# Altium PCB Main_PCB_v1.0.PcbDoc
Units mil, origin at the board's own origin, x right, y up, seen from the top; angles counter-clockwise.
Board outline 532.28 x 531.5 mil, 2 copper layers (Top Layer, Bottom Layer), stack 57 mil thick; 10 components, 6 nets, 31 pads, 4 vias.
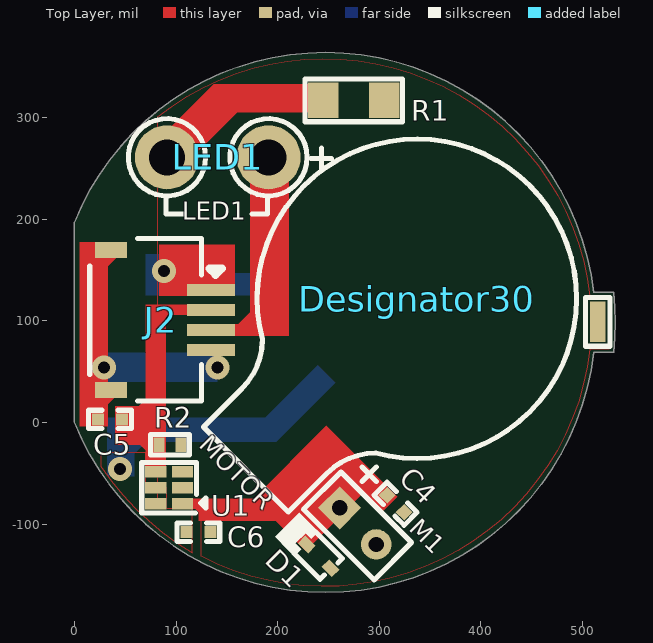
[diagram p0: Top Layer view]
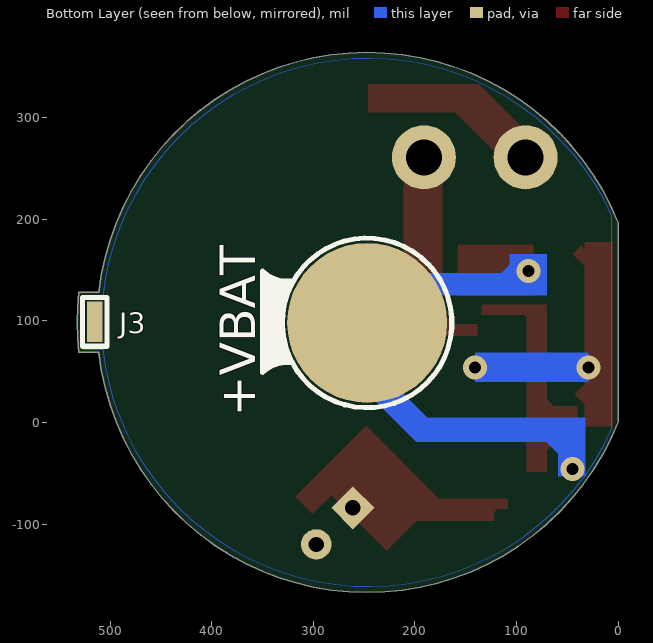
[diagram p1: Bottom Layer view, seen from below]
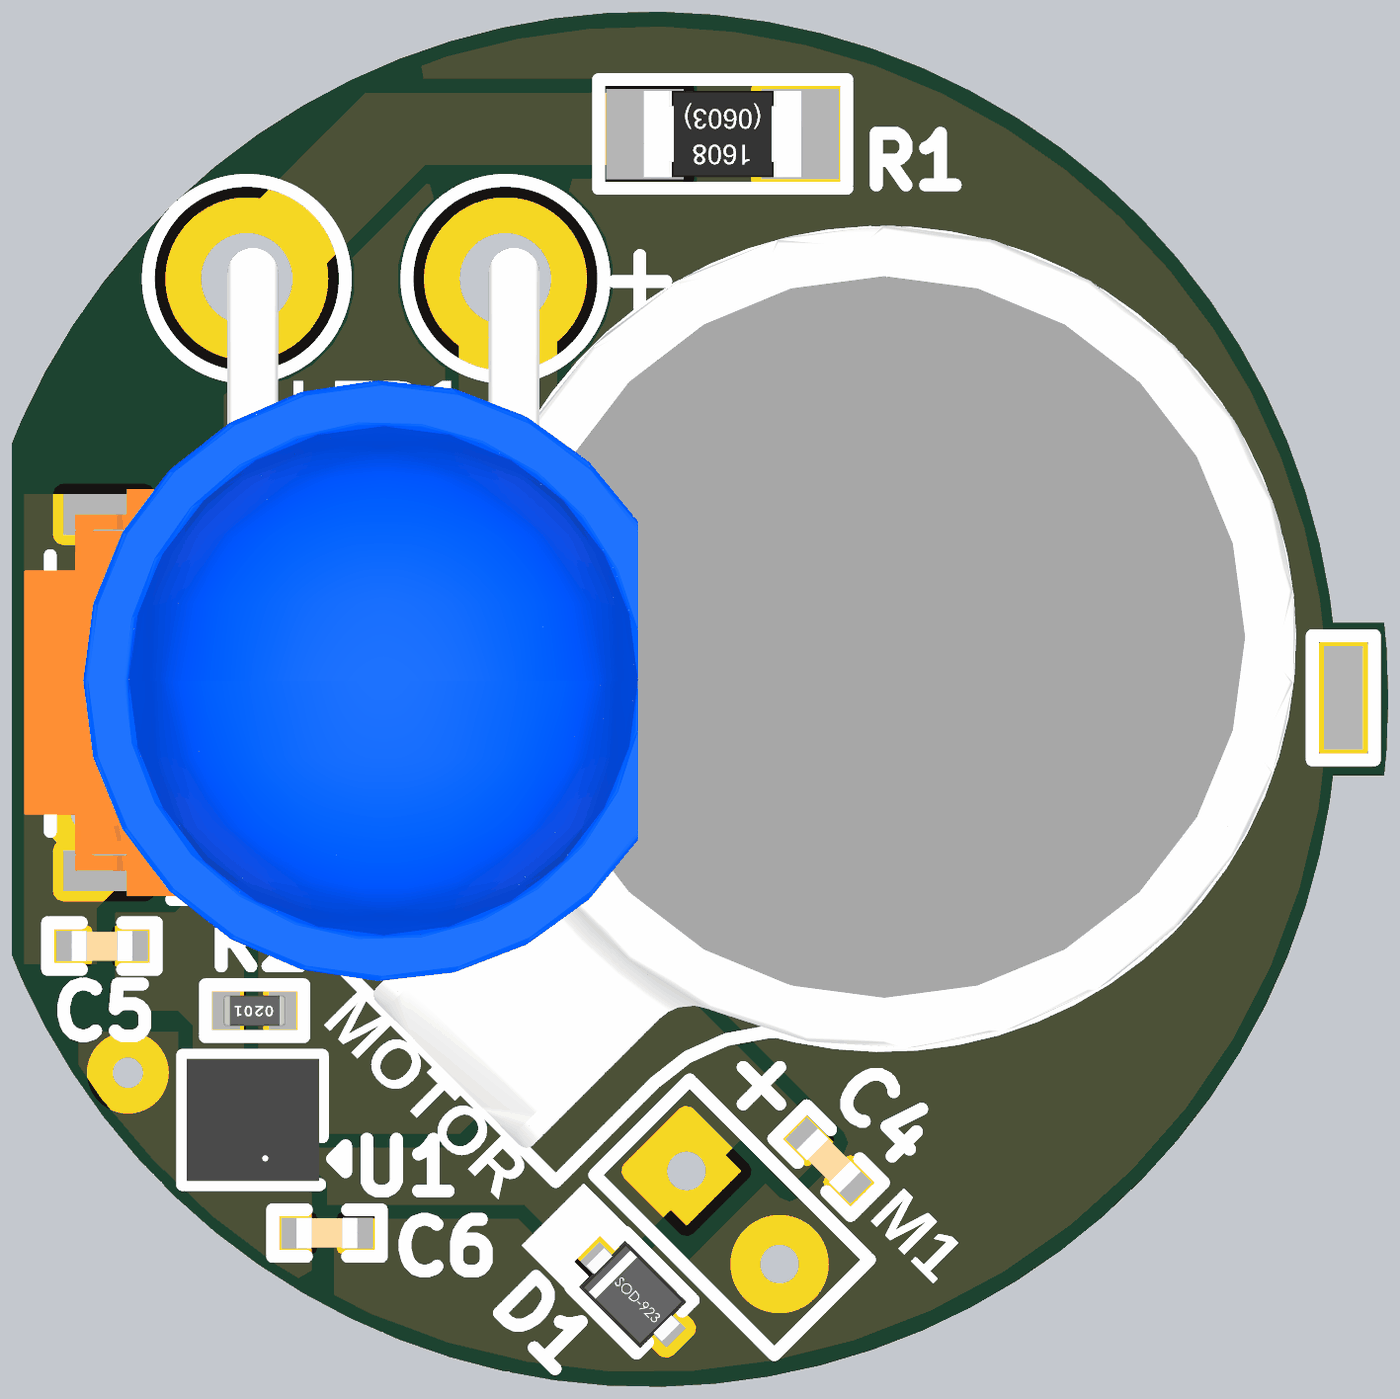
[diagram p2: 3D render of the assembled board from above, using the file's embedded part models]

## Layer stack, top to bottom
Top Solder: solder mask 3, Solder Resist, Dk 3.5
Top Layer: signal copper 10
Dielectric 1: dielectric 37, FR-4, Dk 4.8
Bottom Layer: signal copper 10
Bottom Solder: solder mask 3, Solder Resist, Dk 3.5

## Board outline
0,0 ccw(c246.85,98.43) 510.95,68.9 530.75,68.9 ccw(c246.85,98.43) 530.75,127.95 510.95,127.95 ccw(c246.85,98.43) 0,196.85

## Design rules (kind name [scope] priority, off if disabled: settings)
Clearance Clearance_1 [OnLayer('Bottom Layer')] p1: gap=10 ignorepadtopadclearanceinfootprint=FALSE except(0: Arc-Hole Track-Hole SMDPad-Hole THPad-Hole Via-Hole Fill-Hole Poly-Hole Region-Hole Text-Hole; 20: Arc-Fill Arc-Poly Arc-Region Track-Fill Track-Poly Track-Region SMDPad-Fill SMDPad-Poly SMDPad-Region Via-Fill Via-Poly Via-Region Fill-Fill Fill-Poly Fill-Region Poly-Poly Poly-Region Region-Region)
Clearance [OnLayer('Top Layer')] p2: gap=10 ignorepadtopadclearanceinfootprint=FALSE except(0: Arc-Hole Track-Hole SMDPad-Hole THPad-Hole Via-Hole Fill-Hole Poly-Hole Region-Hole Text-Hole; 3: SMDPad-SMDPad; 5: Arc-SMDPad Track-SMDPad SMDPad-Fill SMDPad-Poly SMDPad-Region Fill-Fill Fill-Poly Fill-Region Poly-Poly Poly-Region Region-Region)
MinimumSolderMaskSliver [All] p1: minsoldermaskwidth=0
PolygonConnect [All] p1: connectstyle=Direct reliefconductorwidth=10 reliefentries=4 polygonreliefangle="90 Angle" airgapwidth=10
RoutingVias [All] p1: holewidth=11.81 width=23.62 viastyle="Through Hole" minholewidth=11.81 minwidth=23.62 maxholewidth=11.81 maxwidth=23.62
SilkToSilkClearance [All] p1: silktosilkclearance=0
SilkToSolderMaskClearance [IsPad] p1: minsilkscreentomaskgap=0 clearancetoexposedcopper=TRUE
SolderMaskExpansion [All] p1: expansion=4 istentingtop=FALSE
Width [All] p1: maxlimit=10 minlimit=10 preferedwidth=10
27 further rules are at their usual default settings.

## Classes and differential pairs
component class Main_PCB: C4 C5 C6 J2 LED1 R1 R2 U1

## Components (designator, comment, footprint, x,y, rotation, side; value= is the part's Value field where it differs from the comment)
C4 "100nF" CAP-0201 316,-80 r135 top
C5 "100nF" CAP-0201 35,3 r0 top
C6 "100nF" CAP-0201 122,-108 r180 top
D1 "1SS427" SOD-923. 240.31,-131.8 r315 top
Designator30 "Comment" "Motor 8mm" 337,122 r315 top locked
J2 "FH19C-4S-0.5SH(10)" FH19C-4S-0.5SH(10) 85,101 r270 top locked
LED1 "333-2UTC/S400-A6" "LED BEND" 141,261 r180 top locked
R1 "1K" Res-0603 275,317 r0 top
R2 "10K" Res-0201 94,-22 r180 top
U1 "LDK120PU33R" "6-DFN (1.2x1.3)" 93.19,-64.25 r180 top locked

## Footprints (in the part's own frame and the unit in brackets; to place one, negate y for a bottom-side part, rotate by r counter-clockwise, add the part's x,y. Pads: shape width x height; smd on the part's side, far side on the other; paste and mask are expansions set on the pad)
"6-DFN (1.2x1.3)" [mm]
  rect 0.53x0.28 smd mask+0.055: 1(-0.335,0.4) 2(-0.335,0) 3(-0.335,-0.4) 4(0.335,-0.4) 5(0.335,0) 6(0.335,0.4)
  silkscreen extent -0.91,-0.64 0.69,0.64, body extent -0.65,-0.6 0.65,0.6, height 0.55
CAP-0201 [mm]
  rect 0.3x0.3 smd mask+0.055: 1(-0.3,0) 2(0.3,0)
  silkscreen extent -0.53,-0.23 0.53,0.23, body extent -0.3,-0.15 0.3,0.15, height 0.28
FH19C-4S-0.5SH(10) [mm]
  rect 0.3x1.2 smd: 1(-0.75,1.25) 2(-0.25,1.25) 3(0.25,1.25) 4(0.75,1.25)
  rect 0.4x0.8 smd: MP1(-1.75,-1.25) MP2(1.75,-1.25)
  silkscreen extent -2.03,-1.78 2.03,1.52, body extent -2,-2.03 2,1.47, height 0.9
"LED BEND" [mm]
  round 1.6 hole 0.9: 1(1.27,0) 2(-1.27,0)
  silkscreen extent -2.84,-0.23 -2.34,0.28, body extent -2.57,-0.3 2.88,6.9, height 17.1
"Motor 8mm" [mil]
  silkscreen extent -157,-238 157,157, body extent -159,-238 159,160, height 118
Res-0201 [mm]
  rect 0.27x0.37 smd mask+0.055: 1(-0.275,0) 2(0.275,0)
  silkscreen extent -0.48,-0.25 0.48,0.25, body extent -0.3,-0.15 0.3,0.15, height 0.29
Res-0603 [mil]
  rect 30x35 smd: 1(-30,0) 2(30,0)
  silkscreen extent -48,-21 48,21, body extent -31,-17 31,17, height 18
SOD-923. [mm]
  rect 0.36x0.27 smd: 1(-0.42,0) 2(0.42,0)
  silkscreen extent -1.12,-0.43 0.46,0.43, body extent -0.52,-0.32 0.53,0.32, height 0.43

## Part data
C4 C5 C6: library part CC0201KRX5R6BB104, "CAP CER 0.1UF 10V X5R 0201", Case Code (Imperial)=0201, Case Code (Metric)=0603, Dielectric=X5R, LCSC Part Number=C190183, Manufacturer=Yageo, Max Operating Temperature=85°C, Min Operating Temperature=-55°C, Resistor Type=Ceramic, Supplier Part Number 1=603-CC201KRX5R6BB104, Tolerance=10%, Voltage Rating=10V, Capacitance=100nF, Case/Package=0201, Category="Ceramic Capacitors", ComponentLink1Description=https://datasheet.ciiva.com/11587/upy-gphc-x5r-4v-to-50v-12-11587190.pdf?src-supplier=Avnet, ComponentLink1URL=https://datasheet.ciiva.com/11587/upy-gphc-x5r-4v-to-50v-12-11587190.pdf?src-supplier=Avnet, Construction=Flat, Depth=0.3mm, Halogen Free="Halogen Free", Height=0.3mm, Lead Free="Lead Free", Length=0.6mm, Manufacturer Part Number=CC0201KRX5R6BB104, Mount="Surface Mount", Packaging="Tape and Reel", Pricing 1="1=0.10000, 10=0.02400, 50=0.02400, 100=0.01900, 1000=0.01100, 10000=0.00900 (USD)", Radiation Hardening=No, RoHS=Yes, RoHS Compliant=Yes, Series=CC, Stock 1=824403, Supplier 1=Mouser, Termination=SMD/SMT, Thickness=0.013inch, Voltage Rating (DC)=10V, Weight=6E-06oz, Width=0.012inch
D1: library part 1SS427,L3M, "DIODE GEN PURP 80V 100MA SOD923", Average Rectified Current=3A, Case/Package=SMC, Forward Voltage=750mV, LCSC Part Number=C16015, Manufacturer="ON Semiconductor / Fairchild", Manufacturer Part Number=SS36, Max Forward Surge Current (Ifsm)=100A, Max Operating Temperature=150°C, Max Repetitive Reverse Voltage (Vrrm)=60V, Max Reverse Current=500uA, Min Operating Temperature=-55°C, Package Quantity=3000, Power Dissipation=2.27W, Supplier Part Number 1=9034425P, Category="Schottky Diodes", ComponentLink1Description=https://datasheet.ciiva.com/4714/ss36-197193-4714610.pdf?src-supplier=Mouser, ComponentLink1URL=https://datasheet.ciiva.com/4714/ss36-197193-4714610.pdf?src-supplier=Mouser, ComponentLink2Description=https://datasheet.ciiva.com/16889/ss36-16889545.pdf?src-supplier=Future+Electronics, ComponentLink2URL=https://datasheet.ciiva.com/16889/ss36-16889545.pdf?src-supplier=Future+Electronics, ComponentLink3Description=https://datasheet.ciiva.com/920/ss34-920433.pdf?src-supplier=Digi-Key, ComponentLink3URL=https://datasheet.ciiva.com/920/ss34-920433.pdf?src-supplier=Digi-Key, ComponentLink4Description=https://datasheet.ciiva.com/920/ss34-920434.pdf?src-supplier=Digi-Key, ComponentLink4URL=https://datasheet.ciiva.com/920/ss34-920434.pdf?src-supplier=Digi-Key, ComponentLink5Description=https://datasheet.ciiva.com/920/ss34-920435.pdf?src-supplier=Digi-Key, ComponentLink5URL=https://datasheet.ciiva.com/920/ss34-920435.pdf?src-supplier=Digi-Key, Current=3A, Current Rating=3A, Element Configuration=Single, Forward Current=3A, Item Type=Diode, Lead Free="Lead Free", Max Reverse Leakage Current=500uA, Max Reverse Voltage (DC)=60V, Max Surge Current=100A, Mount="Surface Mount", Number of Pins=2, Output Current=3A, Packaging="Tape and Reel", Peak Non-Repetitive Surge Current=100A, Polarity=Standard, Pricing 1="100=0.43800, 500=0.34200, 1000=0.27800, 3000=0.25000 (GBP)", Radiation Hardening=No, Reach SVHC Compliant=Yes, RoHS=Yes, RoHS Compliant=Yes, Series=-, Stock 1=100, Supplier 1=Rs, Voltage=60V, Voltage Rating (DC)=60V
J2: "CONN FFC BOTTOM 4POS 0.5MM R/A", Current Rating=500mA, Flammability Rating="UL94 V-0", Insulation Resistance=500MR, LCSC Part Number=C424650, Manufacturer=Hirose, Max Operating Temperature=85°C, Min Operating Temperature=-55°C, Package Quantity=5000, Supplier Part Number 1=H125822CT-ND, Voltage Rating=50V, Actuator Material="Polymer,Polyphenylene,Liquid Crystal Polymer", Category="FFC / FPC", ComponentLink1Description=https://datasheet.ciiva.com/18563/ed-fh19cfh19sc-20140305-18563548.pdf?src-supplier=Digi-Key, ComponentLink1URL=https://datasheet.ciiva.com/18563/ed-fh19cfh19sc-20140305-18563548.pdf?src-supplier=Digi-Key, Contact Material=Bronze, Contact Plating=Gold, Housing Material=Polymer, Item Type="FPC Connector", Manufacturer Part Number=FH19C-4S-0.5SH(10), Mounting Technology="Surface Mount", Number of Positions=4, Packaging="Tape and Reel", Pitch=0.02inch, Pricing 1="1=1.08, 10=0.916, 25=0.878, 50=0.8596, 100=0.8221, 250=0.7474, 500=0.67266, 1000=0.59792, 2500=0.54186 (USD)", RoHS=Yes, RoHS Compliant=Yes, Series=FH19C, Stock 1=7956, Supplier 1=Digi-Key, Termination=Solder, Wire/Cable Type="Flat Flex"
LED1: "Colorless transparence -40℃~+85℃ White light 15° 100mW Plugin,D=5mm Light Emitting Diodes (LED) ROHS", JLCPCB Part Class="Extended Part", LCSC Part Number=C99695, Manufacturer="Everlight Elec", Package=Plugin,D=5mm, Item Type=LED, Manufacturer Part Number=333-2UTC/S400-A6
R1: library part RC0603FR-071KL, "RES SMD 1K OHM 1% 1/10W 0603", Case Code (Imperial)=0603, Case Code (Metric)=1608, LCSC Part Number=C22548, Manufacturer=Yageo, Max Operating Temperature=155°C, Min Operating Temperature=-55°C, Power Rating=100mW, Resistance=1kR, Supplier Part Number 1=311-1.00KHRDKR-ND, Temperature Coefficient=100ppm/°C, Tolerance=1%, Voltage Rating=50V, Case/Package=0603, ComponentLink1Description=https://www.verical.com/server-webapp/html/getDatasheet?partID=409289&src-supplier=Verical, ComponentLink1URL=https://www.verical.com/server-webapp/html/getDatasheet?partID=409289&src-supplier=Verical, ComponentLink2Description=http://documents.rs-components.com/techlib://itc_doclist_GB.htm?stockno=5048928&src-supplier=RSComponents, ComponentLink2URL=http://documents.rs-components.com/techlib://itc_doclist_GB.htm?stockno=5048928&src-supplier=RSComponents, ComponentLink3Description=http://www.yageo.com/documents/recent/PYu-RC0603_51_RoHS_L_4.pdf?src-supplier=Avnet+Europe, ComponentLink3URL=http://www.yageo.com/documents/recent/PYu-RC0603_51_RoHS_L_4.pdf?src-supplier=Avnet+Europe, ComponentLink4Description=http://www.farnell.com/datasheets/2167052.pdf?src-supplier=Element14, ComponentLink4URL=http://www.farnell.com/datasheets/2167052.pdf?src-supplier=Element14, ComponentLink5Description=http://www.farnell.com/datasheets/1868787.pdf?src-supplier=Element14, ComponentLink5URL=http://www.farnell.com/datasheets/1868787.pdf?src-supplier=Element14, ComponentLink6Description=http://www.yageo.com/documents/recent/PYu-RC_Group_51_RoHS_L_2.pdf?src-supplier=Avnet, ComponentLink6URL=http://www.yageo.com/documents/recent/PYu-RC_Group_51_RoHS_L_2.pdf?src-supplier=Avnet, ComponentLink7Description=https://www.verical.com/server-webapp/html/getDatasheet?partID=404327&src-supplier=Verical, ComponentLink7URL=https://www.verical.com/server-webapp/html/getDatasheet?partID=404327&src-supplier=Verical, ComponentLink8Description=http://www.farnell.com/datasheets/443971.pdf?src-supplier=Element14, ComponentLink8URL=http://www.farnell.com/datasheets/443971.pdf?src-supplier=Element14, Composition="Thick Film", Contact Plating=Tin,Matte, Depth=0.8mm, Height=0.45mm, Item Type=Resistor, Lead Free="Lead Free", Length=1.6mm, Manufacturer Part Number=RC0603FR-071KL, Military Standard=Not, Packaging="Tape and Reel", Pricing 1="1=0.1, 10=0.023, 100=0.0094, 1000=0.0042, 2500=0.0037 (USD)", Radiation Hardening=No, REACH SVHC="No SVHC", Stock 1=21472395, Supplier 1=Digi-Key, Termination=SMD/SMT
R2: library part RC0201JR-0710KL, "RES SMD 10K OHM 5% 1/20W 0201", Case Code (Imperial)=0201, Case Code (Metric)=0603, LCSC Part Number=C138117, Manufacturer=Yageo, Max Operating Temperature=125°C, Min Operating Temperature=-55°C, Power Rating=50mW, Resistance=10kR, Resistor Type="Thick Film", Supplier Part Number 1=311-10KNCT-ND, Temperature Coefficient=200ppm/°C, Tolerance=5%, Voltage Rating=25V, Case/Package=0201, Category="Chip SMD Resistors", ComponentLink1Description="New link", ComponentLink2Description=https://datasheet.ciiva.com/8891/pyu-rc0201-51-rohs-l-8-8891388.pdf?src-supplier=Avnet, ComponentLink2URL=https://datasheet.ciiva.com/8891/pyu-rc0201-51-rohs-l-8-8891388.pdf?src-supplier=Avnet, ComponentLink3Description=https://datasheet.ciiva.com/7672/1563626-7672253.pdf?src-supplier=Element14, ComponentLink3URL=https://datasheet.ciiva.com/7672/1563626-7672253.pdf?src-supplier=Element14, ComponentLink4Description=https://datasheet.ciiva.com/28405/pyu-rc0201-51-rohs-l-8-28405613.pdf?src-supplier=Avnet+Europe, ComponentLink4URL=https://datasheet.ciiva.com/28405/pyu-rc0201-51-rohs-l-8-28405613.pdf?src-supplier=Avnet+Europe, ComponentLink5Description=https://datasheet.ciiva.com/7672/1563626-7672254.pdf?src-supplier=Element14, ComponentLink5URL=https://datasheet.ciiva.com/7672/1563626-7672254.pdf?src-supplier=Element14, ComponentLink6Description=https://datasheet.ciiva.com/7660/1421516-7660810.pdf?src-supplier=Element14, ComponentLink6URL=https://datasheet.ciiva.com/7660/1421516-7660810.pdf?src-supplier=Element14, ComponentLink7Description=https://datasheet.ciiva.com/16856/pyu-rc0201-51-rohs-l-8-16856011.pdf?src-supplier=Avnet+Europe, ComponentLink7URL=https://datasheet.ciiva.com/16856/pyu-rc0201-51-rohs-l-8-16856011.pdf?src-supplier=Avnet+Europe, ComponentLink8Description=https://datasheet.ciiva.com/46391/1421516-46391291.pdf?src-supplier=Element14, ComponentLink8URL=https://datasheet.ciiva.com/46391/1421516-46391291.pdf?src-supplier=Element14, Contact Plating=Tin,Matte, Depth=0.3mm, Lead Free="Lead Free", Length=0.6mm, Manufacturer Part Number=RC0201JR-0710KL, Military Standard=Not, Packaging="Tape and Reel", Pricing 1="1=0.10000, 10=0.02600, 100=0.01050, 1000=0.00472, 2500=0.00410, 5000=0.00338 (USD)", Radiation Hardening=No, REACH SVHC=Unknown, RoHS=Yes, Stock 1=1488597, Supplier 1=Digi-Key, Termination=SMD/SMT, Voltage Rating (DC)=25V
U1: "IC REG LINEAR 3.3V 200MA 6DFN", Case/Package=DFN, Dropout Voltage=150mV, LCSC Part Number=C2971162, Manufacturer=STMicroelectronics, Max Operating Temperature=125°C, Max Output Current=200mA, Max Supply Voltage=5.5V, Min Input Voltage=1.9V, Min Operating Temperature=-40°C, Nominal Output Voltage=3.3V, Operating Supply Current=50uA, Package Quantity=6000, Power Supply Rejection Ratio (PSRR)=55dB, Quiescent Current=60uA, Supplier Part Number 1=511-LDK120PU33R, Accuracy=2%, Category="Voltage Regulators - Linear", ComponentLink1Description=https://datasheet.ciiva.com/48475/dm00070790-48475005.pdf?src-supplier=Avnet, ComponentLink1URL=https://datasheet.ciiva.com/48475/dm00070790-48475005.pdf?src-supplier=Avnet, Height=0.45mm, Item Type=IC, Lead Free="Lead Free", Length=1.3mm, Manufacturer Part Number=LDK120PU33R, Mounting Technology="Surface Mount", Number of Outputs=1, Number of Regulators=1, Output Current=200mA, Output Type=Fixed, Output Voltage=3.3V, Packaging="Tape and Reel", Pins=6, Polarity=Positive, Pricing 1="1=0.91, 10=0.752, 50=0.752, 100=0.614, 1000=0.388, 10000=0.343 (USD)", Radiation Hardening=No, Reach SVHC Compliant=No, RoHS=Yes, RoHS Compliant=Yes, Series=-, Stock 1=1169, Supplier 1=Mouser, Width=1.2mm

## Free pads (board coordinates)
  rect 15x40 smd far side mask+2.17: 3(515,99)
  rect 30x30 hole 15 rot 135: 4(261,-84)
  round 30 hole 15: 4(297,-120)
  round 157.48 smd far side: 7(247,98)
  rect 15x40 smd mask+2.17: 8(515,99)

## Via types
v1: diameter 23.62, hole 11.81, Top Layer to Bottom Layer, 4 vias

## Nets (pads, with @x,y where several pads share a name; then routed paths per layer and width w, separated by ;. In a path a pad name is that pad's centre, name@x,y a point inside that pad or via, vN(x,y) a via of type N, cw(c..) or ccw(c..) an arc to the next point about the centre after c; other vN are vias at no path point)
GND: C4.1 C5.1 C6.1 D1.2 J2.4 J2.MP1 J2.MP2 pad.3 pad.4@297,-120 pad.8 R1.2 R2.1 U1.2
  other v1: 28.85,54 141,54
LED: J2.3 LED1.2
MOTOR: C5.2 J2.2 R2.2 U1.4
NetLED1_1: LED1.1 R1.1
OUT: C4.2 D1.1 pad.4@261,-84 U1.1
VBAT: C6.2 J2.1 pad.7 U1.6
  other v1: 45,-46 88,149
pads on no net: U1.3 U1.5

## Polygon pours and split planes (outlines as drawn)
GND on Top Layer "NONET_L01_P000" (solid, shelved, pour order 0): 124.63,-131.79 124.63,-85 82,-85 82,301 cw(c245.83,95.13) 507.35,124 526.04,124 cw(c242.36,98.41) 525.96,72 507.23,72 cw(c245.82,101.72)
VBAT on Top Layer "NONET_L01_P001" (solid, shelved, pour order 1): 70,-64.25 70,-30 26,-30 26,-43 ccw(c262.44,116.05) 116,-128.4 116,-85 91,-85 91,-64.25
GND on Bottom Layer "NONET_L02_P003" (solid, shelved, pour order 3): 6,-6.37 6,203.22 cw(c245.87,95.13) 507.39,124 526.08,124 cw(c242.47,98.41) 526,72 507.27,72 cw(c245.86,101.72)

## Other copper
Top Layer:
  region net OUT: 116.17,-82.46 125,-91.28 132.14,-84.14 123.31,-75.31
  region net GND: 14.86,27.86 29,13.72 43.14,27.86 29,42
  region net GND: 22.26,160.26 31,151.52 45.14,165.66 36.4,174.4
  region net MOTOR: 58.86,-16.43 73,-30.57 87.14,-16.43 73,-2.28
  region net MOTOR: 56.86,9.86 71,-4.28 85.14,9.86 71,24
  region net MOTOR: 86,107 90,103 94,107 90,111
  region net LED: 160.86,96.86 170.36,87.36 184.5,101.5 175,111
  rectangle net GND: 5,-4 33,177.8
  rectangle net OUT: 122,-97 269,-75
  rectangle net OUT: 108.38,-85 257,-75
  region net OUT: 227.5,-126.5 299.5,-54.5 248,-3 176,-75
  rectangle net MOTOR: 40,-22 81,16
  region net NetLED1_1: 71.45,267.45 96.95,241.95 162.5,307.5 137,333
  rectangle net NetLED1_1: 137,305 246,333
  rectangle net LED: 173,85.3 211,283.3
  rectangle net LED: 138.21,85.3 209,97.1
  region net VBAT: 158,175 83,175 83,124.65 158,124.65
  region net OUT: 318.12,-73.12 298.32,-53.32 281.04,-70.6 300.84,-90.4
  rectangle net MOTOR: 82,106 134.21,116
  rectangle net MOTOR: 70,-48.5 90,116
Bottom Layer:
  region net VBAT: 91.86,141.86 106,127.72 120.14,141.86 106,156
  region net VBAT: 44.86,-17.14 59,-31.28 73.14,-17.14 59,-3
  rectangle net GND: 28.85,40 141,69
  region net VBAT: 181.32,-1.32 199,-19 257,39 239.32,56.68
  rectangle net VBAT: 32,-53 59,5
  rectangle net VBAT: 70,126 107,166
  rectangle net VBAT: 32,-19 199,5
  rectangle net VBAT: 70,125 194,147

## Silkscreen, mask and mechanical layers (free items; w line width, h text height)
Top Overlay:
  circle w5: c91,261 r38.08
  circle w5: c191,261 r38.08
  lines w5: 90,220 90,205 107,205 ; 175,205 190,205 190,220 ; 282.93,-58.07 297.07,-43.93 ; 282.93,-43.93 297.07,-58.07 ; 225.53,-85.53 262.3,-48.76 331.77,-118.23 295,-155 225.53,-85.53 ; 503,75 527,75 527,123 503,123 503,75
  text "LED1" at 106.21,193.75 h30
  text "MOTOR" at 117.42,-27.42 h30 r315
  text "M1" at 324.02,-109.53 h30 r315
Bottom Overlay:
  circle w5: c247,98 r83.49
  region: 350,49 350,149 cw(c326.45,172.55) 326.45,139.25 318.51,139.25 cw(c289.61,110.35) 330.49,110.34 330.49,86.66 cw(c290.8,86.65) 318.86,58.59 326.84,58.59 cw(c326.84,25.84)
  lines w5: 320,139 cw(c246.04,98.24) 320.6,58.59 cw(c325.86,24.86) 350,49 350,149 cw(c325.86,173.14) 320.08,139.49 ; 503,75 527,75 527,123 503,123 503,75
  text "J3" at 491,88 h20
  text "+VBAT" at 345.4,5.47 h60 r270
Board Outline:
  the board outline again, w0.5
Fabrication:
  drawing of 191 lines, arcs and shapes, not listed
  text "Layer" at -1513.12,1399.68 h60
  text "Name" at -1103.21,1399.68 h60
  text "Material" at -173.46,1399.68 h60
  text "Thickness" at 686.3,1399.68 h60
  text "Constant" at 1336.14,1399.68 h60
  text "Board Layer Stack" at 1906,1399.68 h60
  text "Top Overlay" at -1103.21,1279.68 h60
  text "Top Solder" at -1103.21,1159.68 h60
  text "Solder Resist" at -173.46,1159.68 h60
  text "0.076mm" at 686.3,1159.68 h60
  text "3.5" at 1336.14,1159.68 h60
  text "1" at -1513.12,1039.68 h60
  text "Top Layer" at -1103.21,1039.68 h60
  text "0.254mm" at 686.3,1039.68 h60
  text "Dielectric 1" at -1103.21,919.68 h60
  text "FR-4" at -173.46,919.68 h60
  text "0.940mm" at 686.3,919.68 h60
  text "4.8" at 1336.14,919.68 h60
  text "2" at -1513.12,799.68 h60
  text "Bottom Layer" at -1103.21,799.68 h60
  text "0.254mm" at 686.3,799.68 h60
  text "Bottom Solder" at -1103.21,679.68 h60
  text "Solder Resist" at -173.46,679.68 h60
  text "0.076mm" at 686.3,679.68 h60
  text "3.5" at 1336.14,679.68 h60
  text "Bottom Overlay" at -1103.21,559.68 h60
  text "Total board thickness:" at -1513.12,439.68 h60
  text "1.600mm" at 686.3,439.68 h60
Drill Drawing:
  circle w10: c-1489.38,1925.83 r33.33
  lines w10: -1522.71,1759.17 -1506.04,1759.17 -1506.04,1742.5 -1472.71,1742.5 -1472.71,1759.17 -1456.04,1759.17 -1456.04,1792.5 -1472.71,1792.5 -1472.71,1809.17 -1506.04,1809.17 -1506.04,1792.5 -1522.71,1792.5 -1522.71,1759.17 ; -1522.71,2109.17 -1456.04,2109.17 -1489.38,2042.5 -1522.71,2109.17
  lines w15: -1582.5,1697.5 5317.64,1697.5 ; -1582.5,2147.5 5317.64,2147.5 ; -1031.62,1547.5 -1031.62,2297.5 ; -551.74,1547.5 -551.74,2297.5 ; 547.94,1547.5 547.94,2297.5 ; 1053.81,1547.5 1053.81,2297.5 ; 1787.61,1547.5 1787.61,2297.5 ; 3287.16,1547.5 3287.16,2297.5 ; 3877.01,1547.5 3877.01,2297.5 ; 4622.81,1547.5 4622.81,2297.5 ; -1582.5,1547.5 5317.64,1547.5 5317.64,2297.5 -1582.5,2297.5 -1582.5,1547.5
  text "Symbol" at -1492.5,2192.5 h72
  text "Count" at -986.62,2192.5 h72
  text "Hole Size" at -506.74,2192.5 h72
  text "Plated" at 592.94,2192.5 h72
  text "Hole Type" at 1098.81,2192.5 h72
  text "Drill Layer Pair" at 1832.61,2192.5 h72
  text "Via/Pad" at 3332.16,2192.5 h72
  text "Pad Shape" at 3922.01,2192.5 h72
  text "Template" at 4667.81,2192.5 h72
  text "4" at -986.62,2042.5 h60
  text "11.81mil (0.300mm)" at -506.74,2042.5 h60
  text "PTH" at 592.94,2042.5 h60
  text "Round" at 1098.81,2042.5 h60
  text "Top Layer - Bottom Layer" at 1832.61,2042.5 h60
  text "Via" at 3332.16,2042.5 h60
  text "Rounded" at 3922.01,2042.5 h60
  text "v60h30" at 4667.81,2042.5 h60
  text "2" at -986.62,1892.5 h60
  text "15.00mil (0.381mm)" at -506.74,1892.5 h60
  text "PTH" at 592.94,1892.5 h60
  text "Round" at 1098.81,1892.5 h60
  text "Top Layer - Bottom Layer" at 1832.61,1892.5 h60
  text "Pad" at 3332.16,1892.5 h60
  text "(Mixed)" at 3922.01,1892.5 h60
  text "(Mixed)" at 4667.81,1892.5 h60
  text "2" at -986.62,1742.5 h60
  text "35.43mil (0.900mm)" at -506.74,1742.5 h60
  text "PTH" at 592.94,1742.5 h60
  text "Round" at 1098.81,1742.5 h60
  text "Top Layer - Bottom Layer" at 1832.61,1742.5 h60
  text "Pad" at 3332.16,1742.5 h60
  text "Rounded" at 3922.01,1742.5 h60
  text "c160h90" at 4667.81,1742.5 h60
  text "8 Total" at -986.62,1592.5 h60